# Altium PCB Nodo_Sensores_pcb.PcbDoc
Units mm, origin at the board's own origin, x right, y up, seen from the top; angles counter-clockwise.
Board outline 33 x 40 mm, 2 copper layers (Top Layer, Bottom Layer); 3 components, 10 nets, 17 pads, 0 vias.
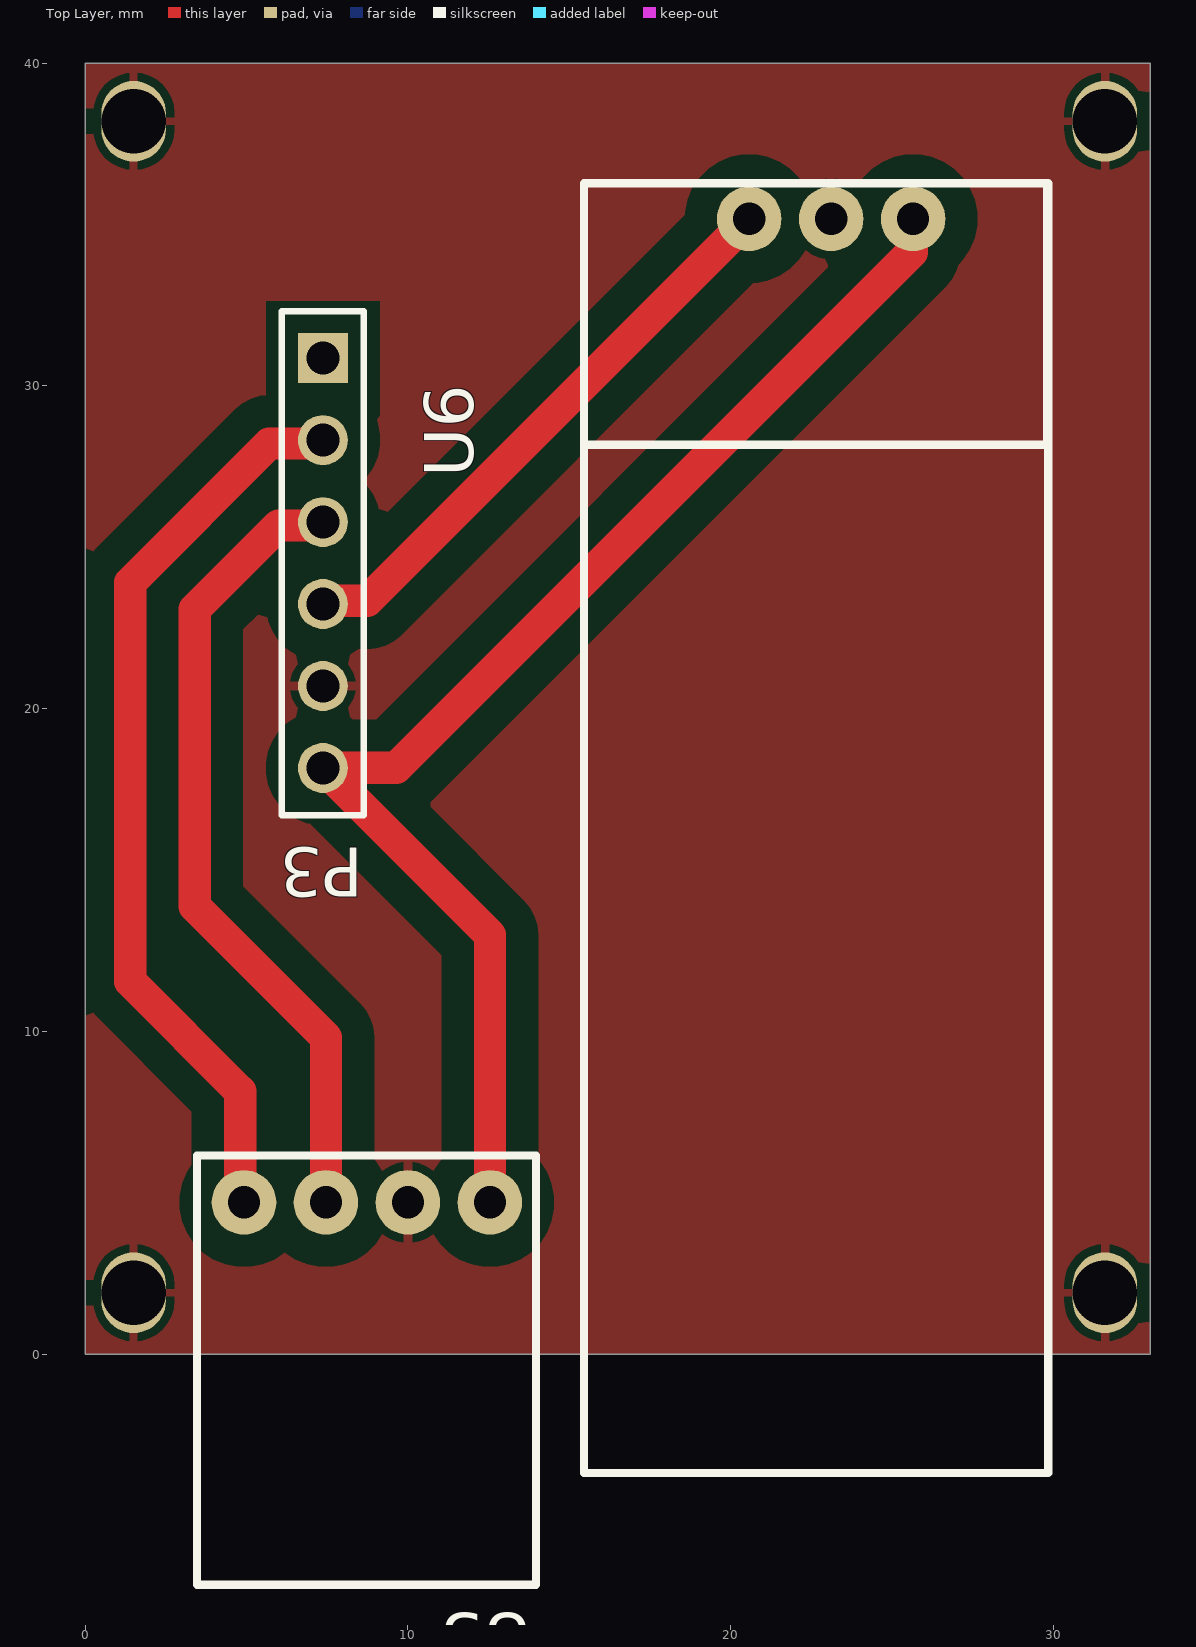
[diagram p0: Top Layer view]
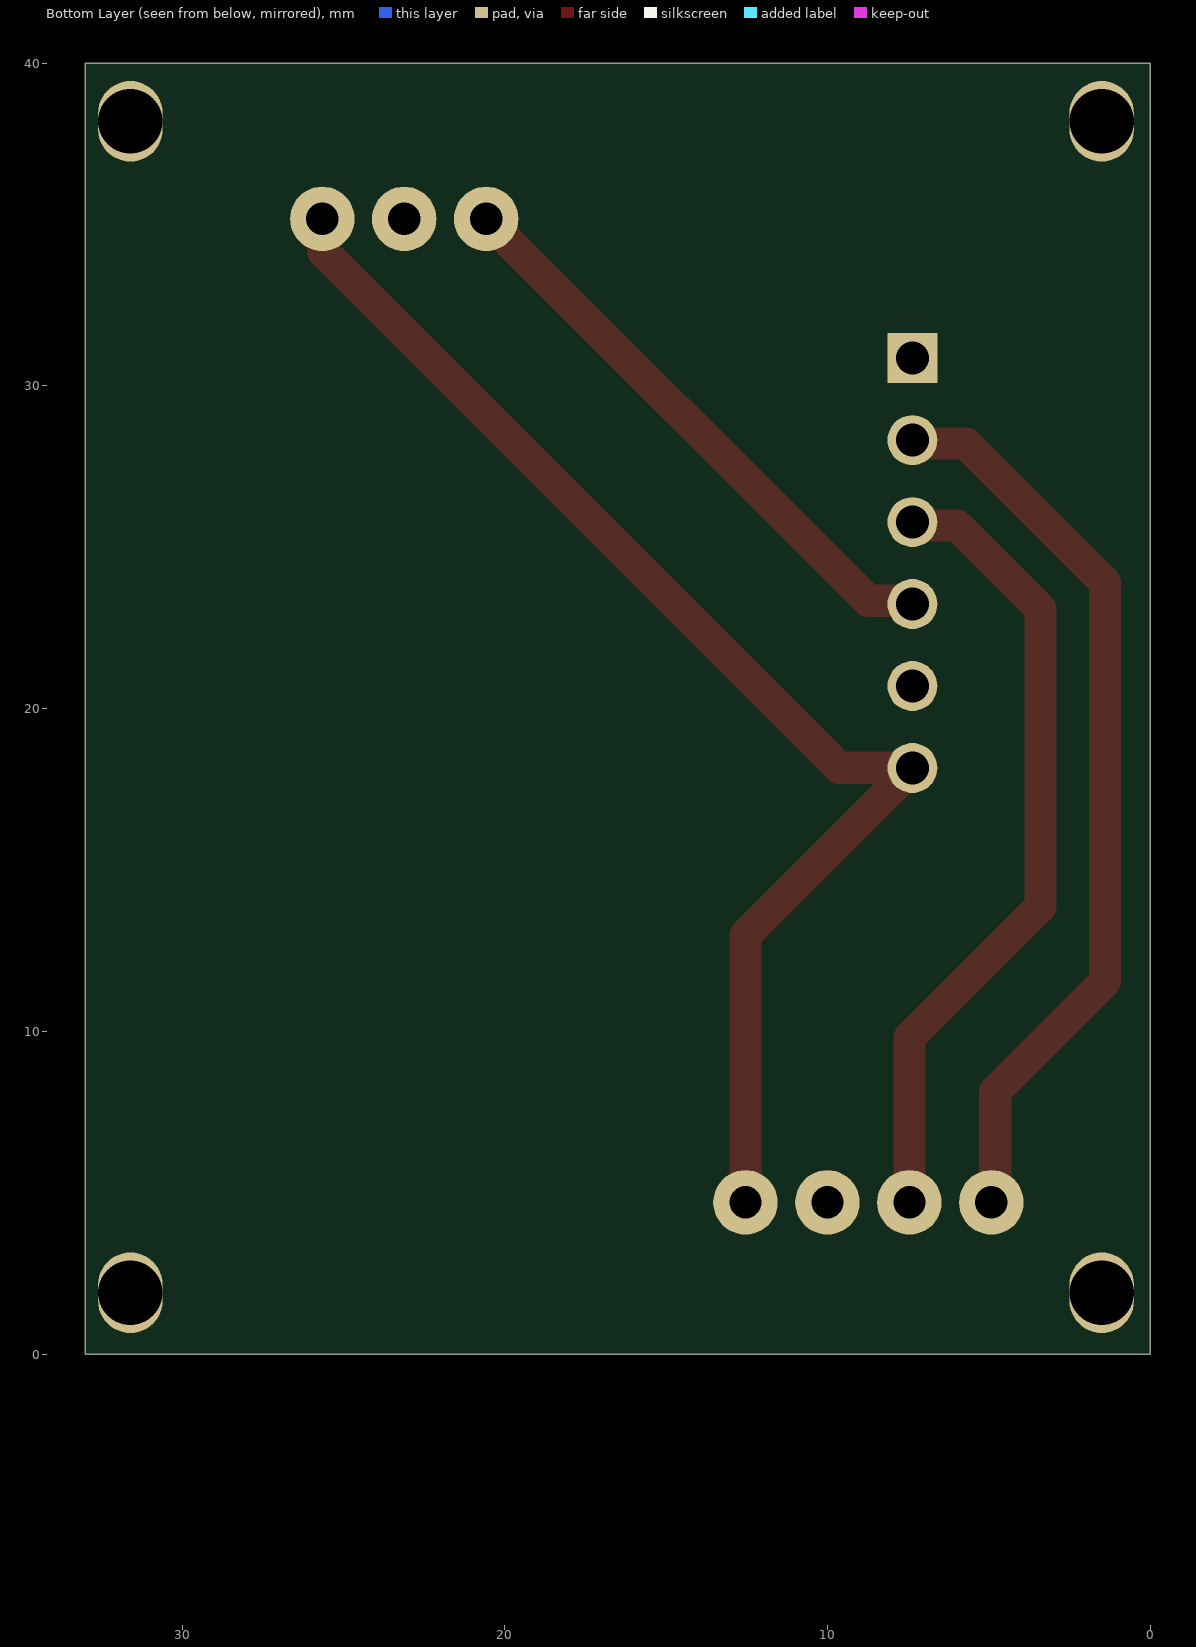
[diagram p1: Bottom Layer view, seen from below]
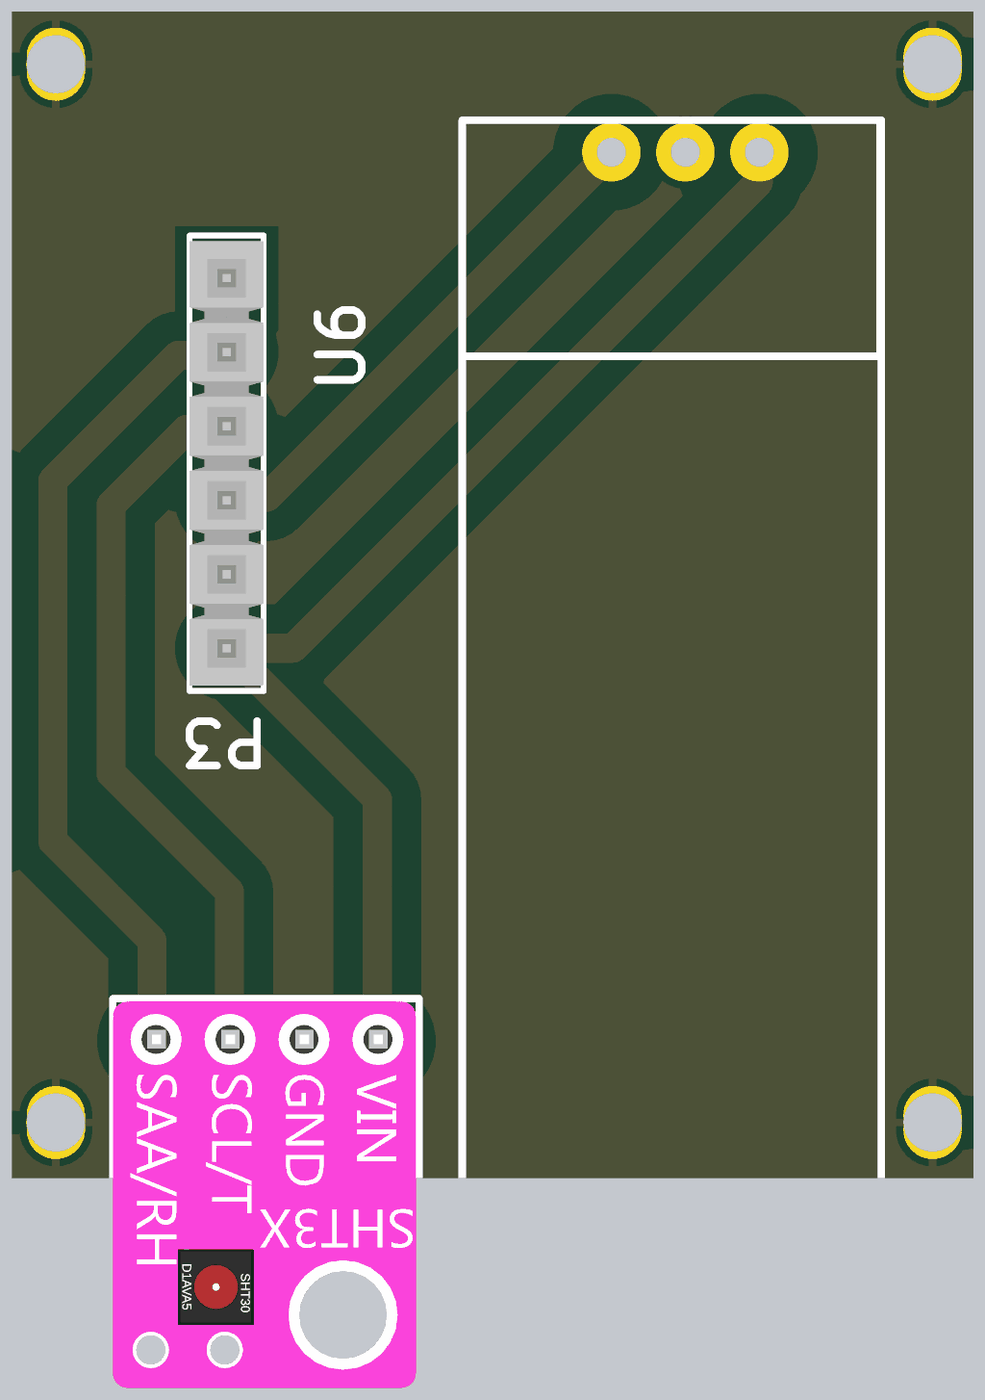
[diagram p2: 3D render of the assembled board from above, using the file's embedded part models]

## Layer stack, top to bottom
Top Solder: solder mask 0.0102, Solder Resist, Dk 3.5
Top Layer: signal copper 0.0356
Dielectric 1: dielectric 0.32, FR-4, Dk 4.8
Bottom Layer: signal copper 0.0356
Bottom Solder: solder mask 0.0102, Solder Resist, Dk 3.5

## Board outline
0,0 33,0 33,40 0,40

## Design rules (kind name [scope] priority, off if disabled: settings)
Clearance [All] p1: gap=1 ignorepadtopadclearanceinfootprint=TRUE
PolygonConnect [All] p1: connectstyle=Relief reliefconductorwidth=0.254 reliefentries=4 polygonreliefangle="90 Angle" airgapwidth=0.254
RoutingVias [All] p1: holewidth=0.711 width=1.27 viastyle="Through Hole" minholewidth=0.711 minwidth=1.27 maxholewidth=0.711 maxwidth=1.27
SolderMaskExpansion [All] p1: expansion=0 istentingtop=FALSE
SupplyNets "Schematic Supply Nets_3" [InNet('+5')] p1: voltage=0.000
SupplyNets "Schematic Supply Nets_2" [InNet('+3V3')] p2: voltage=0.000
SupplyNets "Schematic Supply Nets_1" [InNet('GND')] p3: voltage=0.000
Width [All] p1: maxlimit=1 minlimit=0.254 preferedwidth=1
30 further rules are at their usual default settings.

## Components (designator, comment, footprint, x,y, rotation, side; value= is the part's Value field where it differs from the comment)
P3 "TSW-106-23-F-S" SMTC-TSW-106-23-X-S 7.366,30.861 r270 top
U5 "GY-SHT41" SHT41 8.66,-0.55 r180 top
U6 "YG1006" YG1006 23.054,35.279 r180 top

## Footprints (in the part's own frame and the unit in brackets; to place one, negate y for a bottom-side part, rotate by r counter-clockwise, add the part's x,y. Pads: shape width x height; smd on the part's side, far side on the other; paste and mask are expansions set on the pad)
SHT41 [mm]
  round 2 hole 1: 1(-3.88,-5.25) 2(-1.34,-5.25) 3(1.2,-5.25) 4(3.74,-5.25)
  silkscreen extent -5.31,-6.7 5.2,6.6, body extent -5.2,-6.6 5.2,6.65, height 5.48
SMTC-TSW-106-23-X-S [mm] ".025 SQ Post Terminal Strip Assembly, 1x6 Pins, Vertical, 2.54mm Pitch, Male"
  rect 1.55x1.55 hole 1.02: 1(0,0)
  round 1.55 hole 1.02: 2(2.54,0) 3(5.08,0) 4(7.62,0) 5(10.16,0) 6(12.7,0)
  silkscreen extent -1.46,-1.27 14.16,1.27, body extent -1.27,-1.27 13.97,1.27, height 8.38
YG1006 [mm]
  round 2 hole 1: 1(-2.6,0.1) 2(-0.06,0.1) 3(2.48,0.1)
  silkscreen extent -6.75,-1 7.6,7.1, body extent -6.9,-0.88 7.32,6.88, height 44.07

## Part data
P3: library part CMP-1024-00398-1, "0.025\" SQ Post Header, Through-hole, Vertical, -55 to 125 degC, 2.54 mm Pitch, 6-Pin, Male, RoHS", Manufacturer=Samtec, Temperature Range="-55 to 125 degC", ComponentLink1Description="Manufacturer URL", ComponentLink1URL=http://www.samtec.com, ComponentLink2Description=Datasheet, ComponentLink2URL=http://www.samtec.com/documents/webfiles/pdf/TSW_TH.PDF, ComponentLink3Description="Package Specification", ComponentLink3URL=http://www.samtec.com/documents/webfiles/cpdf/TSW-XXX-XX-XXX-X-XX-XXX-MKT.pdf, DatasheetVersion=F-214, Mounting Technology=Through-hole, Orientation=Vertical, PackageDescription=".025[0.64] SQ. Post Terminal Strip Assembly", PackageReference=TSW-106-23-X-S, PackageVersion="DM, 8/1988", PartNumber=TSW-106-23-F-S, Pitch="2.54 mm", RoHS=True

## Free pads (board coordinates)
  oval 2x2.5 hole 2 paste+0.256: 1(1.5,1.9) 1(1.5,38.2) 1(31.6,1.9) 1(31.6,38.2)

## Nets (pads, with @x,y where several pads share a name; then routed paths per layer and width w, separated by ;. In a path a pad name is that pad's centre, name@x,y a point inside that pad or via, vN(x,y) a via of type N, cw(c..) or ccw(c..) an arc to the next point about the centre after c; other vN are vias at no path point)
+3V3: P3.6 U5.1 U6.1 | length 41.5
  Top Layer w1: U5.1 12.54,12.987 P3.6 7.375,18.17 9.641,18.17 25.614,34.143 25.614,35.139 U6.1
+5: 
GND: P3.5 pad.1 U5.2 U6.2
NetP3_2: P3.2 U5.4 | length 28.5
  Top Layer w1: U5.4@4.8,4.6 4.8,8.14 1.397,11.543 1.397,23.91 5.702,28.216 7.261,28.216 P3.2
NetP3_3: P3.3 U5.3 | length 25.2
  Top Layer w1: P3.3 7.261,25.676 5.991,25.676 3.397,23.082 3.397,13.875 7.46,9.812 U5.3
NetP3_4: P3.4 U6.3 | length 18.2
  Top Layer w1: P3.4 7.471,23.346 8.741,23.346 U6.3
RX: 
SCL: 
SDA: 
TX: 
pads on no net: P3.1

## Polygon pours and split planes (outlines as drawn)
GND on Top Layer "gnd" (solid, pour order 0): 0,40 33,40 33,0 0,0

## Silkscreen, mask and mechanical layers (free items; w line width, h text height)
Top Overlay:
  lines w0.254: 15.454,-3.683 29.845,-3.683 29.845,36.279 15.454,36.279 15.454,-3.683